# Altium PCB Afrodite V10_Final_3K (1).PcbDoc
Units mm, origin at the board's own origin, x right, y up, seen from the top; angles counter-clockwise.
Board outline 95.25 x 44.25 mm, 2 copper layers (Top Layer, Bottom Layer); 46 components, 39 nets, 181 pads, 0 vias.
Unrouted connection lines stored in the file: 7.
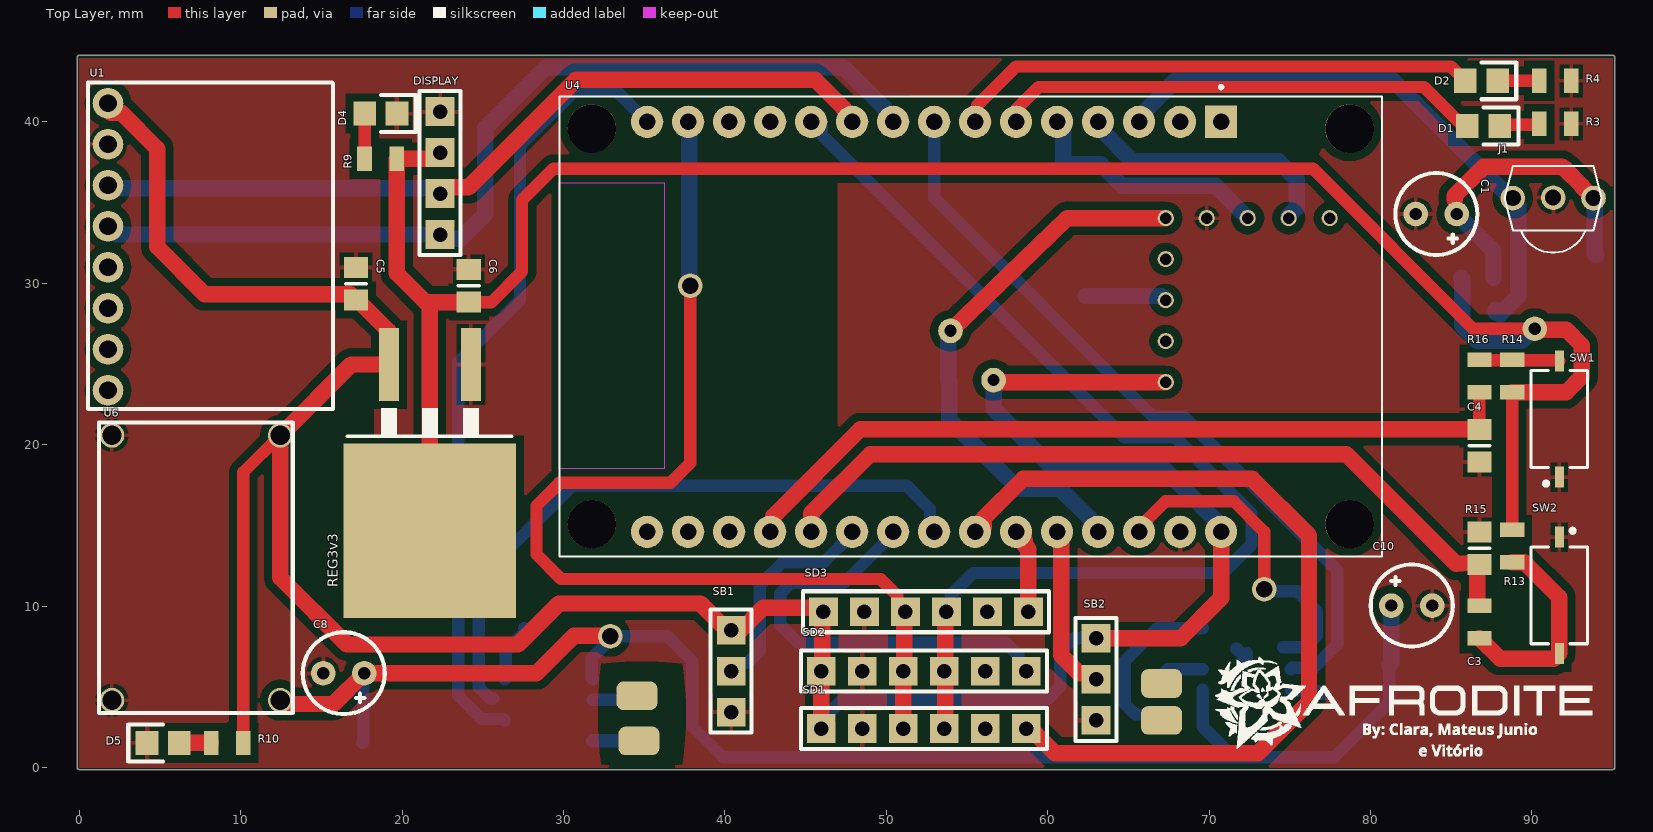
[diagram p0: Top Layer view]
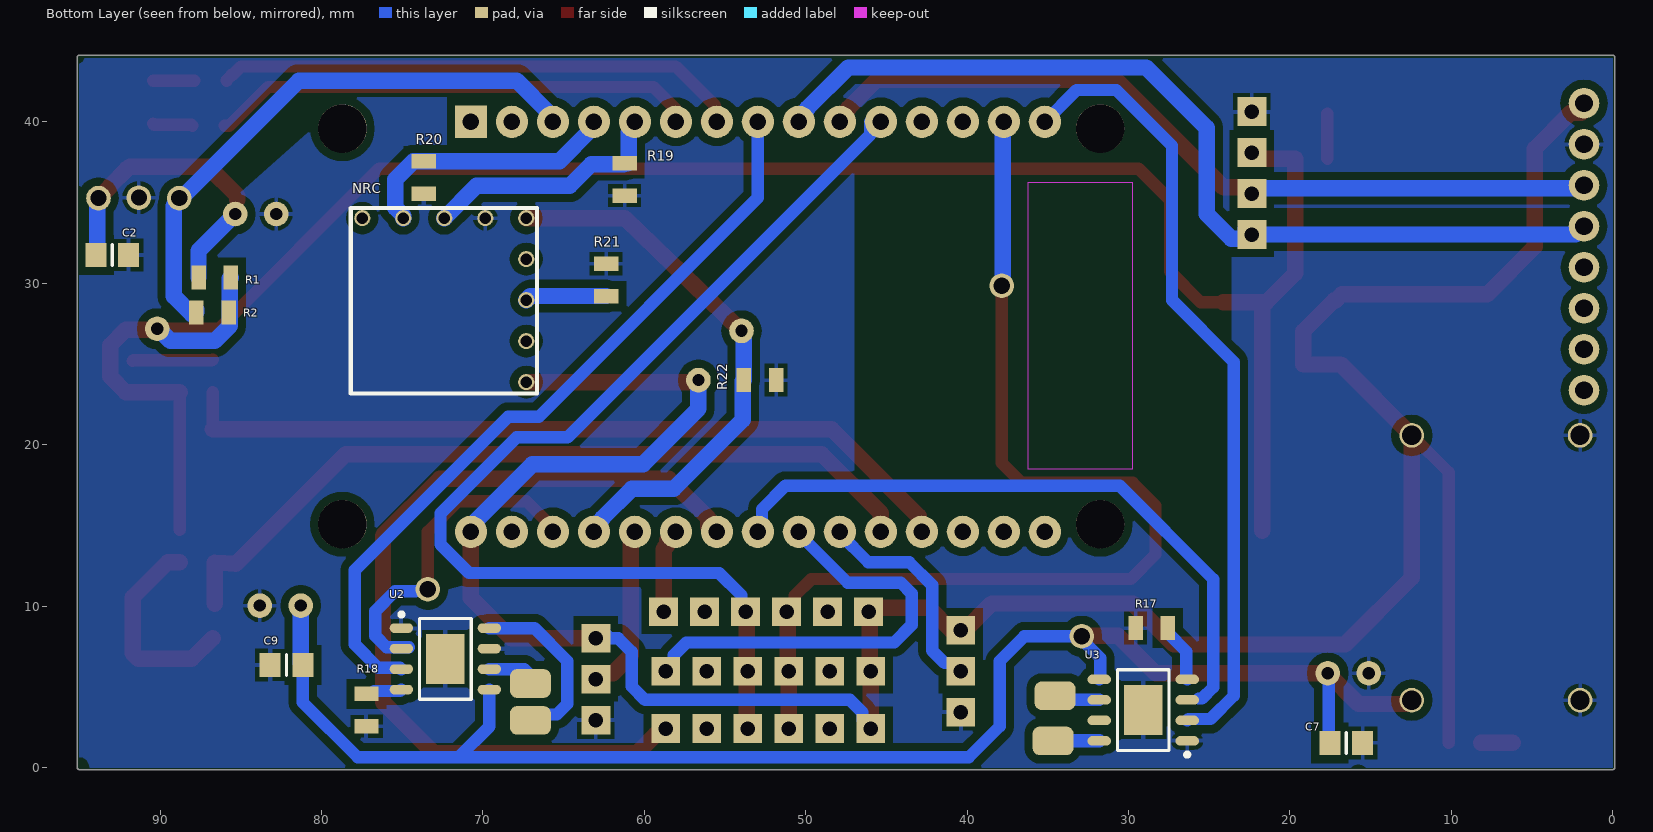
[diagram p1: Bottom Layer view, seen from below]

## Layer stack, top to bottom
Top Solder: solder mask 0.0102, Solder Resist, Dk 3.5
Top Layer: signal copper 0.0356
Dielectric 1: dielectric 0.32, FR-4, Dk 4.8
Bottom Layer: signal copper 0.0356
Bottom Solder: solder mask 0.0102, Solder Resist, Dk 3.5

## Board outline
0,-0.127 cw(c0,0) -0.127,0 -0.127,44 cw(c0,44) 0,44.127 95,44.127 cw(c95,44) 95.127,44 95.127,0 cw(c95,0) 95,-0.127

## Design rules (kind name [scope] priority, off if disabled: settings)
Clearance [All] p1: gap=0.508 ignorepadtopadclearanceinfootprint=FALSE
PolygonConnect [All] p1: connectstyle=Relief reliefconductorwidth=0.254 reliefentries=4 polygonreliefangle="90 Angle" airgapwidth=0.254
RoutingVias [All] p1: holewidth=0.711 width=1.27 viastyle="Through Hole" minholewidth=0.711 minwidth=1.27 maxholewidth=0.711 maxwidth=1.27
SolderMaskExpansion [All] p1: expansion=0.102
Width [All] p1: maxlimit=1.016 minlimit=0.508 preferedwidth=0.762 minimp=50.000000 maximp=50.000000 favimp=50.000000
30 further rules are at their usual default settings.

## Components (designator, comment, footprint, x,y, rotation, side; value= is the part's Value field where it differs from the comment)
C1 "CAP" "CAP ELET .100" 84.074,34.29 r0 top
C2 "CAP" "CAP 0805" 92.964,31.75 r0 bottom
C3 "CAP" "CAP 0805" 86.741,13.589 r270 top
C4 "CAP" "CAP 0805" 86.741,19.939 r90 top
C5 "CAP" "CAP 0805" 17.145,29.972 r270 top
C6 "CAP" "CAP 0805" 24.13,29.845 r270 top
C7 "CAP" "CAP 0805" 16.51,1.524 r0 bottom
C8 "" "CAP ELET .100" 16.383,5.842 r0 top
C9 "CAP" "CAP 0805" 82.169,6.35 r180 bottom
C10 "" "CAP ELET .100" 82.55,10.033 r180 top
D1 "LED" "LED 0805" 86.995,39.751 r0 top
D2 "LED" "LED 0805" 86.868,42.545 r0 top
D4 "LED" "LED 0805" 18.685,40.513 r0 top
D5 "LED" "LED 0805" 5.191,1.524 r180 top
DISPLAY "CONECTOR_4PIN" CON4 22.352,40.64 r270 top
J1 "TSOP1838" TSOP18XX 91.313,35.306 r0 top
NRC "Nano Receiver" Receiver 66.523,34.823 r0 bottom value="Nano Receiver R616XN"
R1 "RESISTOR" "RES 0805" 86.614,30.353 r180 bottom value=100
R2 "RESISTOR" "RES 0805" 86.741,28.194 r180 bottom value=20k
R3 "RESISTOR" "RES 0805" 91.44,39.878 r0 top value=10k
R4 "RESISTOR" "RES 0805" 91.44,42.545 r0 top value=10k
R9 "RESISTOR" "RES 0805" 18.669,37.719 r180 top value=10k
R10 "RESISTOR" "RES 0805" 9.16,1.524 r180 top value=10k
R13 "RESISTOR" "RES 0805" 88.773,13.716 r90 top value=10k
R14 "RESISTOR" "RES 0805" 88.773,24.257 r270 top value=10k
R15 "RESISTOR" "RES 0805" 86.741,9.017 r90 top value=100
R16 "RESISTOR" "RES 0805" 86.741,24.257 r270 top value=100
R17 "RESISTOR" "RES 0805" 28.559,8.636 r180 bottom value=30k
R18 "RESISTOR" "RES 0805" 77.216,3.556 r90 bottom value=30k
R19 "RESISTOR" "RES 0805" 61.214,36.433 r90 bottom value=10k
R20 "RESISTOR" "RES 0805" 73.66,36.56 r90 bottom value=10k
R21 "RESISTOR" "RES 0805" 62.357,30.21 r270 bottom value=10k
R22 "RESISTOR" "RES 0805" 52.832,24.003 r0 bottom value=10k
REG3v3 "g108433" TO263-3 21.717,15.367 r180 top (schematic designator g108433)
SB1 "CONECTOR_3PIN" CON3 40.386,3.429 r90 top
SB2 "CONECTOR_3PIN" CON3 62.992,2.921 r90 top
SD1 "CONECTOR_6PIN" CON6 58.674,2.413 r180 top
SD2 "CONECTOR_6PIN" CON6 58.674,5.969 r180 top
SD3 "CONECTOR_6PIN" CON6 58.801,9.652 r180 top
SW1 "PushButtonSMD" PUSHBUTTON.SMD 91.694,21.59 r90 top
SW2 "PushButtonSMD" PUSHBUTTON.SMD 91.694,10.668 r270 top
U1 "Sensor giroscopio acelerometro" mpu6050 1.27,41.148 r0 top value=MPU6050
U2 "DRV 8871" DRV-8871 72.321,6.731 r180 bottom
U3 "DRV 8871" DRV-8871 29.083,3.556 r0 bottom
U4 "ESP32-DEVKIT-V1" MODULE_ESP32_DEVKIT_V1 55.224,27.305 r270 top
U6 "Regulador de Tensão" PCBComponent_1 2.046,20.574 r0 top value=MINI-360

## Footprints (in the part's own frame and the unit in brackets; to place one, negate y for a bottom-side part, rotate by r counter-clockwise, add the part's x,y. Pads: shape width x height; smd on the part's side, far side on the other; paste and mask are expansions set on the pad)
"CAP 0805" [mm] "0805"
  rect 1.3x1.5 smd: 1(-1.016,0) 2(1.016,0)
  silkscreen extent 0,-0.65 0,0.65, body extent -1.03,-0.61 0.97,0.59, height 0.88
"CAP ELET .100" [mil]
  round 60 hole 30: 1(-50,0) 2(50,0)
  silkscreen extent -100,-100 100,100, body extent -98,-99 98,98, height 453
CON3 [mil]
  rect 70x70 hole 35.43: 1(0,0) 2(100,0) 3(200,0)
  silkscreen extent -50,-50 250,50, body extent -39,-47 239,46, height 519
CON4 [mil]
  rect 70x70 hole 35.43: 1(0,0) 2(100,0) 3(200,0) 4(300,0)
  silkscreen extent -50,-50 350,50, body extent -50,-47 343,45, height 519
CON6 [mil]
  rect 70x70 hole 35.43: 1(0,0) 2(100,0) 3(200,0) 4(300,0) 5(400,0) 6(500,0)
  silkscreen extent -50,-50 550,50, body extent -50,-47 543,46, height 519
DRV-8871 [mm] "SOIC, 8-Leads, Body 4,90x3,90mm, Pitch 1,27mm, Thermal Pad 3,10x2,40mm, IPC Medium Density"
  oval 1.45x0.6 smd: 1(-2.725,1.905) 2(-2.725,0.635) 3(-2.725,-0.635) 4(-2.725,-1.905) 5(2.725,-1.905) 6(2.725,-0.635) 7(2.725,0.635) 8(2.725,1.905)
  rect 2.4x3.1 smd: 1(0,0)
  silkscreen extent -2.85,-2.5 1.6,2.88, body extent -2,-2.5 2,2.5, height 1.7
"LED 0805" [mm] "0805"
  rect 1.4x1.5 smd: 1(-1,0) 2(1,0)
  silkscreen extent 0,-1.14 2.16,1.14, body extent -1.03,-0.4 1.03,0.51, height 0.85
MODULE_ESP32_DEVKIT_V1 [mm]
  rect 2x2 hole 1.02: 1(-12.7,15.515)
  round 2 hole 1.02: 2(-12.7,12.975) 3(-12.7,10.435) 4(-12.7,7.895) 5(-12.7,5.355) 6(-12.7,2.815) 7(-12.7,0.275) 8(-12.7,-2.265) 9(-12.7,-4.805) 10(-12.7,-7.345) 11(-12.7,-9.885) 12(-12.7,-12.425) 13(-12.7,-14.965) 14(-12.7,-17.505) 15(-12.7,-20.045) 16(12.7,-20.045) 17(12.7,-17.505) 18(12.7,-14.965) 19(12.7,-12.425) 20(12.7,-9.885) 21(12.7,-7.345) 22(12.7,-4.805) 23(12.7,-2.265) 24(12.7,0.275) 25(12.7,2.815) 26(12.7,5.355) 27(12.7,7.895) 28(12.7,10.435) 29(12.7,12.975) 30(12.7,15.515)
  round 3 hole 3 unplated: ""(-12.28,23.475) ""(-12.28,-23.475) ""(12.23,23.475) ""(12.23,-23.475)
  Keep-Out Layer region: 8.78,-25.475 -8.91,-25.475 -8.91,-18.985 8.78,-18.985
  Keep-Out Layer region: 8.78,-25.475 -8.91,-25.475 -8.91,-18.985 8.78,-18.985
  silkscreen extent -14.95,-25.48 14.23,25.48, body extent -14.22,-25.53 14.28,25.4, height 4.9
mpu6050 [mm]
  round 1.9 hole 1.1: 1(0.508,0) 2(0.508,-2.54) 3(0.508,-5.08) 4(0.508,-7.62) 5(0.508,-10.16) 6(0.508,-12.7) 7(0.508,-15.24) 8(0.508,-17.78)
  silkscreen extent -0.74,-18.95 14.45,1.3, body extent -3.86,-19.02 14.5,1.3, height 36.48
PCBComponent_1 [mm]
  round 1.524 hole 1.2: 1(10.4,-16.4) 2(-0.025,-16.4) 3(10.4,0) 4(-0.025,0)
  silkscreen extent -0.82,-17.2 11.17,0.8, body extent -0.82,-17.2 11.17,0.8, height 3.75
PUSHBUTTON.SMD [mm] "SODFL, 2-Leads, Body 3,40x7,98mm, IPC Medium Density"
  rect 1.3x0.55 smd: 1(-3.6,0) 2(3.6,0)
  silkscreen extent -4.12,-1.75 3,1.75, body extent -3,-1.75 3,1.75, height 2
Receiver [mm]
  round 1 hole 0.7 paste+0 mask+0.102: 1(10.947,0.787)
  round 1 hole 0.7: 2(8.407,0.787) 3(5.867,0.787) 4(3.327,0.787) 5(0.787,0.787) 6(0.787,3.327) 7(0.787,5.867) 8(0.787,8.407) 9(0.787,10.947)
  silkscreen extent 0.13,0.15 11.66,11.66, body extent 0,0 11.8,12.78, height 2.3
"RES 0805" [mm] "0805 (1/8W)"
  rect 0.9x1.5 smd: 1(-1,0) 2(1,0)
  body extent -1.02,-0.63 0.95,0.6, height 0.48
TO263-3 [mm]
  rect 1.25x4.5 smd: 1(-2.54,-9.6) 3(2.54,-9.6)
  rect 10.7x10.8 smd: 2(0,0.7)
  silkscreen extent -5.08,-6.88 5.11,-5.15, body extent -5.16,-9.53 4.9,5.71, height 4.84
TSOP18XX [mil]
  round 60 hole 39.37: 1(98.38,-1.05) 2(-98.47,-1.05) 3(0,0)
  silkscreen extent -118,-134 118,78, body extent -143,-143 146,50, height 706

## Part data
C1 C8 C10: library part "CAP. ELETROLÍTICO", "Capacitor"
  C1: Valor=10nF
  C8 C10: Valor=47uF
C2 C3 C4 C5 C6 C7 C9: library part "CAP. CERÂMICO", "Capacitor", Criado em=26/06/2012, Criador por="Luigi Eduardo", Pertence a=Trincabotz
  C2: Valor=100uF
  C3 C4 C5 C6 C7 C9: Valor=100nF
J1: "IR Receiver and Demodulator", Package=None, Availability=Unavailable, MP=TSOP1838, Price=None
NRC: library part Receiver, "Orange R616XN Nano Receiver"
R1 R2 R3 R4 R9 R10 R13 R14 R15 R16 R17 R18 R19 R20 R21 R22: "Resistor"
U1: library part mpu6050, "Sera usado na afrodite"
U4: "Dual core, Wi-Fi: 2.4 GHz up to 150 Mbits/s,BLE (Bluetooth Low Energy) and legacy Bluetooth, 32 bits, Up to 240 MHz", Package=None, Availability=Unavailable, MP=ESP32-DEVKIT-V1, Price=None
U6: library part Rregulador-Mini-360, "Mini Regulador de Tensão Ajustável / Step Down - Saída 1V a 17VDC"

## Free pads (board coordinates)
  round 1.524 hole 1.016: 7(73.406,11.039) 9(32.893,8.128) 20(37.846,29.845)
  rrect50% 2.54x1.778 all layers, no hole: 14(34.544,4.445) 15(34.671,1.651) 17(67.056,2.921) 18(67.056,5.207)
  round 1.524 hole 0.762: 22(56.642,24.003) 24(53.975,27.051) 25(90.17,27.178)

## Nets (pads, with @x,y where several pads share a name; then routed paths per layer and width w, separated by ;. In a path a pad name is that pad's centre, name@x,y a point inside that pad or via, vN(x,y) a via of type N, cw(c..) or ccw(c..) an arc to the next point about the centre after c; other vN are vias at no path point)
GND: C1.1 C2.1 C3.1 C4.1 C5.1 C6.1 C7.1 C8.1 C9.1 C10.1 D4.2 D5.2 DISPLAY.1 J1.3 NRC.4 R3.2 R4.2 R17.1 R18.1 R19.1 R20.1 R21.1 R22.1 REG3v3.1 SB1.1 SB2.1 SD1.5 SD2.5 SD3.5 SW1.1 SW2.1 U1.2 U2.1 U2.7 U3.1 U3.7 U4.2 U4.29 U6.2 U6.4 | length 1.2
  Bottom Layer w0.762: U2.1@71.686,7.366 72.321,6.731 U2.1@72.321,7.081
NetC1_2: C1.2 C2.2 J1.1 R1.1 | length 18.9
  Top Layer w1.016: 85.217,35.179 85.217,35.433 86.995,37.211 91.88,37.211 92.007,37.084 92.049,37.084 93.091,36.042 93.091,36 J1.1
  Bottom Layer w1.016: C1.2 87.614,32.02 R1.1 ; J1.1 93.896,35.195 93.896,31.834 C2.2
NetC3_2: C3.2 R15.2 U4.20 | length 49.3
  Top Layer w1.016: U4.20 45.339,15.748 49.006,19.415 78.502,19.415 85.299,12.618 86.614,12.7 R15.2@86.614,10.144
NetC4_2: C4.2 R16.2 U4.19 | length 49.3
  Top Layer w0.762: C4.2 R16.2
  Top Layer w1.016: U4.19 42.987,14.793 42.987,15.555 48.387,20.955 C4.2
NetC5_2: C5.2 NRC.9 pad.22 R10.1 REG3v3.3 SB1.3 SB2.3 SD1.6 SD2.6 SD3.6 U1.1 U4.30 U6.3 | length 175
  Top Layer w0.762: R10.1 10.16,18.288 U6.3 ; pad.22 pad.22@56.769,23.876 ; NRC.9@67.264,23.83 NRC.9
  Top Layer w1.016: U1.1 1.947,40.979 1.947,40.574 2.592,40.574 4.826,38.34 4.826,32.258 7.762,29.322 16.779,29.322 C5.2 17.245,28.956 19.177,27.024 REG3v3.3 16.839,24.967 U6.3 12.446,11.751 16.577,7.62 27.178,7.62 29.718,10.16 38.481,10.16 40.132,8.509 SB1.3 40.978,8.509 42.375,9.906 45.847,9.906 SD3.6 46.038,9.588 46.038,6.032 SD2.6 SD1.6 ; pad.22@56.769,23.876 NRC.9 ; SB2.3 68.239,8.001 70.739,10.501 U4.30
  Bottom Layer w0.762: SD1.6@45.974,2.794 46.355,2.794 46.482,2.921 46.482,3.416 47.257,4.191 59.944,4.191 60.769,5.016 60.769,7.163 61.608,8.001 62.103,8.001 SB2.3@62.611,8.509
  Bottom Layer w1.016: pad.22 56.642,22.225 60.071,18.796 66.929,18.796 70.739,14.986 U4.30
NetC6_2: C6.2 DISPLAY.2 pad.25 R1.2 R2.2 R9.1 R13.2 R14.2 REG3v3.2 | length 132.3
  Top Layer w0.762: C6.2 25.527,28.829 27.432,30.734 27.432,35.155 29.381,37.104 76.434,37.104 86.36,27.178 pad.25 ; R13.2 R14.2
  Top Layer w1.016: REG3v3.2 21.717,28.575 21.463,28.829 ; DISPLAY.2 21.971,37.719 R9.1 19.669,30.623 21.463,28.829 ; C6.2 21.463,28.829 ; R14.2 92.123,23.257 93.091,24.225 93.091,26.155 92.116,27.129 90.219,27.129 pad.25
  Bottom Layer w1.016: R1.2 85.672,30.295 85.672,27.358 86.602,26.428 89.351,26.428 90.101,27.178 pad.25
NetC7_2: C7.2 C8.2 C9.2 C10.2 pad.9 U2.5 U3.5 U6.1 | length 96.2
  Top Layer w0.762: C10.2@81.153,9.906 C10.2
  Top Layer w1.016: U6.1 12.683,3.937 15.748,3.937 C8.2 28.318,5.842 30.646,8.17 32.851,8.17 pad.9
  Bottom Layer w0.762: C7.2 17.59,1.587 17.59,5.779 C8.2 ; U3.5 31.75,5.519 31.75,6.779 32.893,7.922 pad.9 36.449,8.128 37.973,6.604 37.973,2.553 39.891,0.635 71.501,0.635 ; U2.5 69.596,2.54 71.501,0.635 ; C9.2 81.153,4.036 77.752,0.635 71.501,0.635
  Bottom Layer w1.016: C9.2 81.28,6.477 C10.2
NetD1_1: D1.1 U4.6 | length 30.3
  Top Layer w0.762: U4.6 58.039,40.767 59.436,42.164 83.312,42.164 85.725,39.751 D1.1
NetD1_2: D1.2 R3.1 | length 2.5
  Top Layer w0.762: D1.2 88.059,39.814 90.376,39.814 R3.1
NetD2_1: D2.1 U4.7 | length 33.5
  Top Layer w0.762: U4.7 56.134,40.005 55.626,40.513 55.626,41.021 58.039,43.434 84.979,43.434 85.499,42.914 85.549,42.914 85.868,42.595 D2.1
NetD2_2: D2.2 R4.1 | length 2.6
  Top Layer w0.762: D2.2 R4.1
NetD4_1: D4.1 R9.2 | length 2.8
  Top Layer w0.762: R9.2 17.677,37.727 17.677,40.505 D4.1
NetD5_1: D5.1 R10.2 | length 2
  Top Layer w1.016: D5.1 R10.2
NetDISPLAY_3: DISPLAY.3 U1.3 U4.10 | length 50.5
  Top Layer w1.016: DISPLAY.3 22.733,35.941 24.105,35.941 30.767,42.603 45.592,42.603 47.355,40.84 47.355,40.795 47.879,40.271 U4.10
  Bottom Layer w1.016: U1.3 1.947,35.899 22.013,35.899 DISPLAY.3
NetDISPLAY_4: DISPLAY.4 U1.4 U4.9 | length 58.7
  Bottom Layer w1.016: U1.4 2.286,33.02 DISPLAY.4 22.733,33.401 22.733,32.766 23.622,32.766 25.146,34.29 25.146,39.624 28.893,43.371 47.364,43.371 49.895,40.84 49.895,40.795 50.419,40.271 U4.9
NetJ1_2: J1.2 R2.1 U4.3 | length 35.8
  Top Layer w0.762: U4.3@65.659,39.874 U4.3
  Bottom Layer w1.016: U4.3 65.847,40.193 65.847,40.504 67.888,42.545 81.409,42.545 88.743,35.211 89.138,34.816 89.138,29.194 88.032,28.088 87.741,28.378 R2.1
NetJ5_1: pad.15 U3.8 | length 2.9
  Bottom Layer w0.838: U3.8 pad.15
NetJ5_2: pad.14 U3.6 | length 2.8
  Bottom Layer w0.762: U3.6 34.29,4.191 pad.14
NetJ6_1: pad.17 U2.8 | length 11
  Bottom Layer w0.762: pad.17 66.687,3.29 65.417,3.29 64.77,3.937 64.77,6.604 66.802,8.636 U2.8
NetJ6_2: pad.18 U2.6 | length 3.1
  Bottom Layer w0.762: pad.18@66.802,5.461 67.437,6.096 U2.6
NetNRC_2: NRC.2 R20.2 U4.4 | length 16.6
  Bottom Layer w1.016: U4.4 63.307,39.817 63.307,39.506 65.253,37.56 R20.2 74.297,37.56 75.426,36.431 75.426,34.689 74.93,34.193 NRC.2
NetNRC_3: NRC.3 R19.2 U4.5 | length 15.5
  Bottom Layer w1.016: U4.5 60.579,39.739 60.972,39.346 60.972,37.491 61.03,37.433 R19.2 61.272,37.375 63.283,37.375 64.622,36.036 70.39,36.036 NRC.3
NetNRC_5: NRC.5 pad.24 R22.2 U4.27 | length 33.4
  Top Layer w1.016: pad.24 61.214,34.036 NRC.5
  Bottom Layer w1.016: pad.24@53.832,26.517 R22.2 53.89,23.945 53.89,21.548 58.166,17.272 60.763,17.272 62.595,15.44 62.595,15.395 63.119,14.871 U4.27
NetNRC_7: NRC.7 R21.2 | length 5.1
  Bottom Layer w1.016: R21.2 67.056,29.21 NRC.7
NetR13_1: R13.1 R15.1 SW2.2 | length 12.9
  Top Layer w1.016: R15.1 88.027,6.731 91.357,6.731 SW2.2 91.694,10.541 89.519,12.716 R13.1
NetR14_1: R14.1 R16.1 SW1.2 | length 5
  Top Layer w0.762: R16.1 86.775,25.224 91.66,25.224 SW1.2
NetR17_2: R17.2 U3.4 | length 3.7
  Bottom Layer w0.762: U3.4 26.416,5.519 26.416,7.193 27.559,8.336 R17.2
NetR18_2: R18.2 U2.4 | length 2.3
  Bottom Layer w0.762: U2.4 75.127,4.745 76.727,4.745 76.916,4.556 R18.2
NetSB1_2: SB1.2 U4.21 | length 13.5
  Bottom Layer w0.762: SB1.2 40.894,6.477 41.389,6.477 42.164,7.252 42.164,11.303 43.577,12.716 46.121,12.716 47.879,14.474 U4.21
NetSB2_2: SB2.2 U4.26 | length 10.8
  Top Layer w0.762: SB2.2@62.357,5.969 SB2.2@62.611,5.969
  Top Layer w1.016: U4.26 60.833,14.351 60.833,6.945 61.936,5.842 62.611,5.842 SB2.2
NetSD1_1: SD1.1 U4.24 | length 53.4
  Top Layer w1.016: U4.24@55.753,14.605 56.023,14.875 56.023,15.44 58.474,17.891 72.66,17.891 76.183,14.368 76.183,4.047 73.025,0.889 60.452,0.889 59.309,2.032 59.055,2.032 SD1.1
NetSD1_3: SD1.3 SD2.3 SD3.3 U4.11 | length 67.2
  Top Layer w1.016: SD1.3 53.657,2.476 53.657,5.969 53.657,9.588 SD3.3
  Bottom Layer w0.762: U4.11 45.99,40.005 45.99,39.223 64.758,20.455 67.919,20.455 72.628,15.746 72.628,13.823 70.858,12.052 55.359,12.052 53.975,10.668 SD3.3@53.975,10.414
NetSD1_4: pad.20 SD1.4 SD2.4 SD3.4 U4.14 | length 66.7
  Top Layer w0.762: pad.20 37.846,18.875 36.607,17.636 29.741,17.636 28.321,16.216 28.321,13.208 29.845,11.684 49.644,11.684 50.673,10.655 50.673,10.16 SD3.4
  Top Layer w1.016: SD1.4 SD2.4 51.117,6.032 51.117,9.588 SD3.4
  Bottom Layer w1.016: U4.14 37.782,39.941 37.782,29.909 pad.20
NetSD2_1: SD2.1 U4.22 | length 27.3
  Bottom Layer w0.762: U4.22 50.419,14.474 50.12,14.174 47.391,11.446 44.103,11.446 43.434,10.777 43.434,8.828 44.515,7.747 57.391,7.747 58.166,6.972 58.166,6.477 SD2.1
NetSD3_1: SD3.1 U4.25 | length 5.3
  Top Layer w1.016: U4.25 58.563,14.081 58.563,13.77 58.801,13.532 SD3.1
NetU2_2: pad.7 U2.2 U4.28 | length 20.1
  Top Layer w0.762: U4.28 65.659,14.859 67.294,16.494 71.521,16.494 73.406,14.609 pad.7 pad.7@73.47,10.906
  Bottom Layer w0.762: 74.168,10.922 75.438,10.922 76.66,9.7 76.66,8.144 75.963,7.447 U2.2@74.572,7.447
NetU2_3: U2.3 U4.8 | length 47.4
  Bottom Layer w0.762: U4.8 52.959,35.306 66.54,21.725 68.445,21.725 77.93,12.24 77.93,7.617 76.49,6.177 75.127,6.177 U2.3
NetU3_2: U3.2 U4.15 | length 49.3
  Bottom Layer w0.762: U3.2 26.277,3.002 24.914,3.002 23.474,4.442 23.474,25.125 27.305,28.956 27.305,38.52 30.759,41.974 33.21,41.974 U4.15
NetU3_3: U3.3 U4.23 | length 40.4
  Bottom Layer w0.762: U3.3@25.654,4.272 25.441,4.272 24.744,4.969 24.744,11.663 30.545,17.464 51.243,17.464 52.705,16.002 52.705,15.194 52.959,14.94 U4.23
pads on no net: NRC.1 NRC.6 NRC.8 SD1.2 SD2.2 SD3.2 U1.5 U1.6 U1.7 U1.8 U4. U4.1 U4.12 U4.13 U4.16 U4.17 U4.18

## Polygon pours and split planes (outlines as drawn)
GND on Top Layer "top_gnd" (solid, pour order 8): 0,43.942 0,0 94.996,0 94.996,43.942
GND on Bottom Layer "net_gnd" (solid, pour order 10): 0,43.942 0,0 94.996,0 94.996,43.942

## Other copper
Top Layer:
  pour cut-out: 64.135,7.239 ccw(c84.36,4.576) 64.135,1.914 ccw(c67.572,24.033) 69.977,1.778 ccw(c49.237,4.508) 69.977,7.239 ccw(c67.056,-14.948)
  pour cut-out: 32.308,6.413 ccw(c55.942,3.302) 32.308,0.191 ccw(c34.848,19.484) 37.388,0.191 ccw(c13.754,3.302) 37.388,6.413 ccw(c34.848,-12.88)
  pour cut-out: 69.189,7.339
  pour cut-out: 87.503,19.431 87.503,15.24 88.138,15.494 88.011,20.32
  pour cut-out: 72.009,14.859 71.501,13.589 71.501,8.255 74.073,8.255 72.898,10.16
  pour cut-out: 70.924,16.958 67.518,-0.643 75.666,3.408 75.528,13.888
  pour cut-out: 73.533,18.796 78.359,18.669 79.756,16.891 76.708,15.113 73.279,18.415
  pour cut-out: 59.055,17.145 57.658,15.875 59.182,15.367 65.151,15.367 66.675,17.145
  pour cut-out: 87.63,11.938 87.63,8.128 88.392,7.493 90.932,7.366 90.932,10.287 89.027,12.065
  pour cut-out: 33.528,39.37 32.893,37.846 76.708,37.719 78.359,41.402 33.274,41.783
  pour cut-out: 18.288,24.257 11.43,18.161 11.562,13.135 18.288,8.44
  pour cut-out: 27.305,13.081 27.305,9.525 27.94,9.525 29.464,11.303
  pour cut-out: 29.845,17.145 30.607,16.891 29.972,15.367 30.48,13.843 33.274,14.605 57.404,13.843 57.776,11.049 51.472,11.049 48.514,12.319 30.216,12.581 28.829,14.732 29.083,14.097
  pour cut-out: 32.639,16.891 33.655,15.113 41.783,15.367 44.577,18.796 38.608,18.796 36.957,17.018
  pour cut-out: 36.449,18.796
  pour cut-out: 36.449,36.449 46.99,36.703 46.99,18.288 38.623,18.426
  pour cut-out: 36.195,19.05 37.211,19.177 37.338,28.956 36.449,29.845 36.195,26.416
  pour cut-out: 56.007,16.383
  pour cut-out: 47.063,16.023 49.43,18.39 57.358,18.39 57.407,18.273 55.298,16.165 54.428,15.676 54.311,15.535 54.147,15.535 53.539,16.005 52.959,16.12 52.117,15.865 51.888,15.676 51.771,15.535 51.607,15.535 50.999,16.005 50.123,16.091 49.577,15.865 49.231,15.535 49.067,15.535 48.721,15.865 48.175,16.091 47.299,16.005
  pour cut-out: 37.084,36.322
  pour cut-out: 38.486,30.954
  pour cut-out: 37.084,36.322
Bottom Layer:
  pour cut-out: 48.054,38.394 cw(c48.348,38.295) 48.348,38.605 48.459,38.605 ccw(c48.459,38.899) 48.667,38.691 48.88,38.904 cw(c48.95,38.834) 48.95,38.934 cw(c49.012,38.934) 48.968,38.977 49.067,39.075 49.231,39.075 cw(c49.231,39.037) 49.258,39.064 49.577,38.745 49.577,38.519 50.715,38.519 51.261,38.745 51.49,38.934 51.607,39.075 51.771,39.075 52.056,38.79 52.062,35.148 ccw(c52.167,35.148) 52.145,35.046 52.27,34.744 65.528,21.469 65.788,21.209 64.77,21.209
  pour cut-out: 24.13,25.019 24.13,12.573 24.257,12.446 26.035,14.224 26.035,25.4 25.4,26.035
  pour cut-out: 50.927,14.224
  pour cut-out: 48.188,10.795 52.959,10.795 54.229,11.811 55.499,12.7 70.358,12.573 70.866,13.335 69.596,14.224 50.292,13.462
  pour cut-out: 29.718,19.05 29.718,17.653 25.4,13.335 25.273,17.272 25.146,26.035 27.94,28.829 27.94,38.735 29.845,40.005 30.861,38.1 32.004,37.973 33.274,38.862 33.528,39.751 34.036,39.497 34.798,38.862 35.814,38.989 36.957,39.243 36.758,36.582 30.099,36.449
  pour cut-out: 29.21,42.672 25.908,39.37 25.908,34.163 23.593,31.848 23.593,26.141 26.035,28.575 26.797,29.591 26.67,35.814 26.67,38.735 30.48,42.672
  pour cut-out: 72.125,11.039 71.306,11.276 73.262,13.189 73.494,13.59 73.525,15.211 73.642,15.26 77.033,11.869 77.033,10.761 76.916,10.712 76.072,11.556 75.67,11.788 74.409,11.819 74.046,12.148 73.406,12.32 73.074,12.276 72.297,11.68
  pour cut-out: 80.423,39.711 80.741,41.964 87.688,34.449 87.895,34.29 87.895,33.211 87.778,33.163
  pour cut-out: 2.54,34.671 2.921,33.528 20.828,33.274 21.209,34.671
  pour cut-out: 33.226,16.44 33.427,16.196 33.613,15.847 33.737,15.376 33.867,15.35 34.108,15.676 34.337,15.865 34.599,16.005 34.883,16.091 35.179,16.12 35.475,16.091 35.759,16.005 36.021,15.865 36.25,15.676 36.449,15.367 51.733,15.535 51.782,15.657 51.054,16.637 33.147,16.764
  pour cut-out: 47.752,24.13
  pour cut-out: 36.824,18.361 46.99,18.415 46.99,36.83 45.444,38.5 45.043,38.519 44.497,38.745 43.87,38.934 43.641,38.745 42.799,38.49 41.957,38.745 41.728,38.934 41.611,39.075 41.33,38.934 41.101,38.745 39.679,38.605 39.188,38.934 39.071,39.075 38.807,38.954 38.807,30.678 38.752,28.939 37.514,28.608 36.757,28.981 36.744,18.459
  pour cut-out: 48.175,38.519
  pour cut-out: 48.26,38.1

## Silkscreen, mask and mechanical layers (free items; w line width, h text height)
Top Overlay:
  drawing of 2741 lines, arcs and shapes, not listed
Mechanical 1:
  lines w0.254: 0,35.687 0.127,35.56 ; 0.508,0 0,0 ; 0.508,44 0,44 ; 0,0 95,0 95,44 0,44 ; 0,0 0,44